# Altium PCB STEP_DRIVER_V3.0.PcbDoc (part 2 of 5)
Units mm, origin at the board's own origin, x right, y up, seen from the top; angles counter-clockwise.
Board outline 245.25 x 200.25 mm, 2 copper layers (Top Layer, Bottom Layer), stack 1.371 mm thick; 477 components, 170 nets, 1104 pads, 876 vias.
Unrouted connection lines stored in the file: 4.
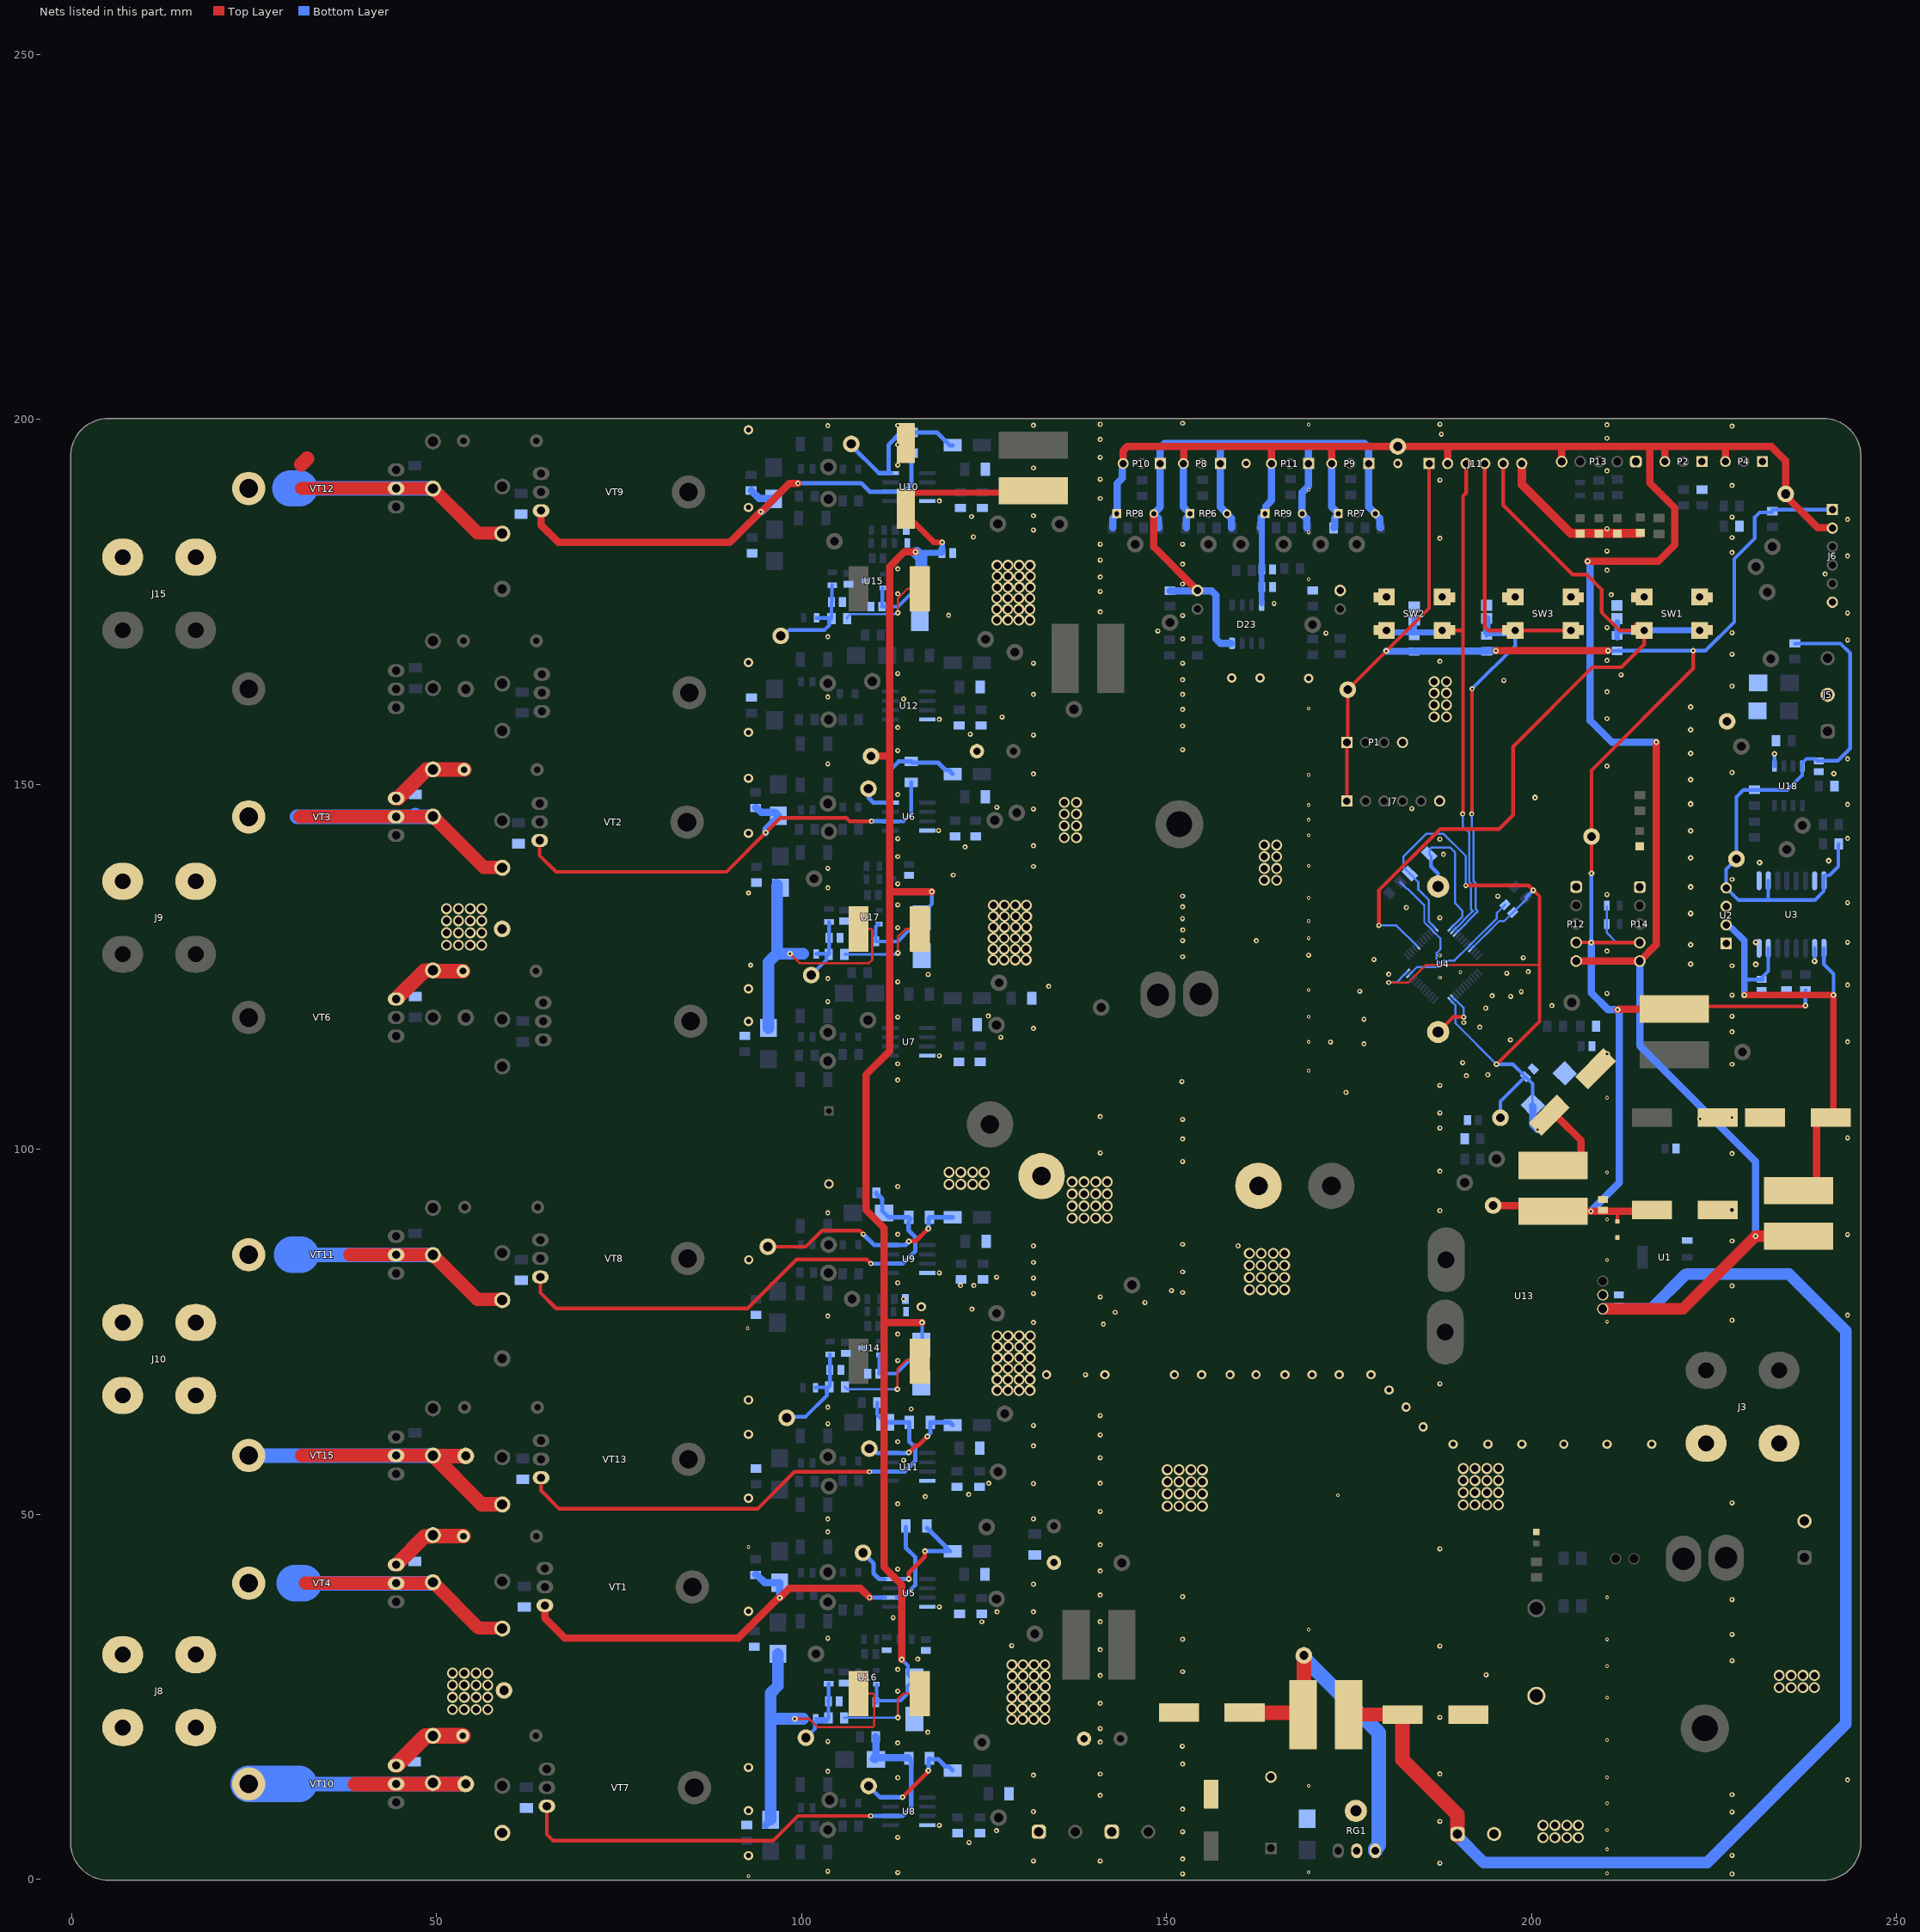
[diagram p2: the nets of this part, all layers, seen from the top]

## Part data
C1 C2 C45 C57 C58 C90 C91: library part 1000uF_10V_Size_F
C3: library part CMP-05427-000015-1, "CAP ALUM 100UF 20% 50V SMD", Capacitance=100uF, Leakage Current=100uA, Manufacturer=Panasonic, Package=SF, Ripple Current=200mA, Temperature="-40°C to +85°C", Temperature Range High=+85°C, Temperature Range Low=-40°C, Tolerance=20%, Voltage=50V, Automotive=Yes, Automotive Grade="Grade 3", Category=Cap, ComponentLink2Description=Datasheet, ComponentLink2URL=https://industrial.panasonic.com/cdbs/www-data/pdf/RDE0000/ABA0000C1145.pdf, Device Class L1="Passive Components", Device Class L2=Capacitors, Device Class L3="Aluminum Electrolytic Capacitors", Digikey Description="CAP ALUM 100UF 20% 50V SMD", Dissipation Factor=0.12%, Height=10.5mm, Lead Free=Yes, Life=2000Hours, Manufacturer Part Number=EEE-1HA101UP, Material=Aluminum, Mouser Description="Cap Aluminum Lytic 100uF 50V 20% (8 X 10.2mm) SMD 200mA 2000h 85C Automotive T/R", Octopart=https://octopart.com/eee-1ha101up-panasonic-55396734, RoHS=TRUE, Voltage Rating=50V
C4 C5 C88: library part CAP-POLAR
C6 C61 C62 C63 C64: "Capacitor Polarised", Manufacturer_Name=Vishay, Mouser Part Number=74-293D106X9050E2TE3, Arrow Part Number=293D106X9050E2TE3, Height=4.3mm, Manufacturer_Part_Number=293D106X9050E2TE3
  C6: Arrow Price/Stock=https://www.arrow.com/en/products/293d106x9050e2te3/vishay, Datasheet Link=http://www.vishay.com/doc?40002, Mouser Price/Stock=https://www.mouser.com/Search/Refine.aspx?Keyword=74-293D106X9050E2TE3
  C61 C62 C63 C64: Arrow Price/Stock=https://www.arrow.com/en/products/293d106x9050e2te3/vishay?region=nac, Datasheet Link=http://www.vishay.com/docs/40002/293d.pdf, Mouser Price/Stock=https://www.mouser.co.uk/ProductDetail/Vishay-Sprague/293D106X9050E2TE3?qs=N31o%252Bt096gu9lsvzLRhHsg%3D%3D
C7 C33 C48 C55 C56 C60 C70 C72 C73 C74 C77 C78 C79 C81 C83 C84 C86 C87: library part CAP-NON-POLAR
C8 C10 C17 C18 C19 C20 C21 C22 C23 C26 C27 C28 C40 C46 C49 C51 C53 C59 C65 C66 C67 C68 C85 C89 C92 C93 C94 C95 C96: library part CMP-1036-04552-2, "CAP CER 0.22UF 50V X7R 0805", Capacitance="0.22 μF", Manufacturer=KEMET, Package=C0805C-DN, Temperature="-55°C to +125°C", Temperature Characteristic=X7R, Temperature Coefficient=30ppm/°C, Temperature Range High=+125°C, Temperature Range Low=-55°C, Tolerance=0.1, Voltage Rating="50 V", Automotive=No, Category=Cap, ComponentLink2Description=Datasheet, ComponentLink2URL=https://content.kemet.com/datasheets/KEM_C1003_C0G_SMD.pdf, Device Class L1="Passive Components", Device Class L2=Capacitors, Device Class L3="Ceramic Capacitors", Digikey Description="CAP CER 0.22UF 50V X7R 0805", Height=0.88mm, Ipc Land Pattern Name=CAPC200125X78, Lead Free=Yes, Manufacturer Part Number=C0805C224K5RACTU, Material=Ceramic, Mouser Description="CAP CER 0.22UF 50V X7R 0805", Octopart=https://octopart.com/c0805c224k5ractu-kemet-144670, RoHS=TRUE
C42: library part CMP-00287-17080245-1, "ECQ-E2224JFW ECQE, Met Polyester Film Cap Radial Lead 250VDC, 0.22uF, 5%, L/S =10mm, Blk CRMP", Capacitance=220nF, Case/Package=Radial, Dielectric=PET, Dielectric Material=Polyester, Max Operating Temperature=105°C, Min Operating Temperature=-40°C, Tolerance=5%, Voltage Rating (DC)=250V, Height - Seated (Max)=15.494mm, Lead Pitch=10mm, Length=11.9888mm, Mount="Through Hole", NexarPartId=17080245, RoHS=Compliant, Termination=Radial, Width=5.5118mm
C43: library part CMP-1036-04552-2, "CAP CER  2.2UF 50V X7R 0805", Capacitance="0.22 μF", Manufacturer=KEMET, Manufacturer Part Number=C0805C224K5RACTU, Package=C0805C-DN, Temperature="-55°C to +125°C", Temperature Characteristic=X7R, Temperature Coefficient=30ppm/°C, Temperature Range High=+125°C, Temperature Range Low=-55°C, Tolerance=0.1, Voltage Rating="50 V", Automotive=No, Category=Cap, ComponentLink2Description=Datasheet, ComponentLink2URL=https://content.kemet.com/datasheets/KEM_C1003_C0G_SMD.pdf, Device Class L1="Passive Components", Device Class L2=Capacitors, Device Class L3="Ceramic Capacitors", Digikey Description="CAP CER 0.22UF 50V X7R 0805", Height=0.88mm, Ipc Land Pattern Name=CAPC200125X78, Lead Free=Yes, Material=Ceramic, Mouser Description="CAP CER 0.22UF 50V X7R 0805", Octopart=https://octopart.com/c0805c224k5ractu-kemet-144670, RoHS=TRUE
C44: library part CMP-1036-04552-2, "CAP CER 2.2UF 50V X7R 0805", Capacitance="0.22 μF", Manufacturer=KEMET, Manufacturer Part Number=C0805C224K5RACTU, Package=C0805C-DN, Temperature="-55°C to +125°C", Temperature Characteristic=X7R, Temperature Coefficient=30ppm/°C, Temperature Range High=+125°C, Temperature Range Low=-55°C, Tolerance=0.1, Voltage Rating="50 V", Automotive=No, Category=Cap, ComponentLink2Description=Datasheet, ComponentLink2URL=https://content.kemet.com/datasheets/KEM_C1003_C0G_SMD.pdf, Device Class L1="Passive Components", Device Class L2=Capacitors, Device Class L3="Ceramic Capacitors", Digikey Description="CAP CER 0.22UF 50V X7R 0805", Height=0.88mm, Ipc Land Pattern Name=CAPC200125X78, Lead Free=Yes, Material=Ceramic, Mouser Description="CAP CER 0.22UF 50V X7R 0805", Octopart=https://octopart.com/c0805c224k5ractu-kemet-144670, RoHS=TRUE
C47 C50 C52 C54: library part CMP-1036-04552-2, "CAP CER 0.22UF 50V X7R 0805", Capacitance="0.22 μF", Manufacturer=KEMET, Manufacturer Part Number=C0805C224K5RACTU, Package=C0805C-DN, Temperature="-55°C to +125°C", Temperature Characteristic=X7R, Temperature Coefficient=30ppm/°C, Temperature Range High=+125°C, Temperature Range Low=-55°C, Tolerance=0.1, Voltage Rating="50 V", Automotive=No, Category=Cap, ComponentLink2Description=Datasheet, ComponentLink2URL=https://content.kemet.com/datasheets/KEM_C1003_C0G_SMD.pdf, Device Class L1="Passive Components", Device Class L2=Capacitors, Device Class L3="Ceramic Capacitors", Digikey Description="CAP CER 0.22UF 50V X7R 0805", Height=0.88mm, Ipc Land Pattern Name=CAPC200125X78, Lead Free=Yes, Material=Ceramic, Mouser Description="CAP CER 0.22UF 50V X7R 0805", Octopart=https://octopart.com/c0805c224k5ractu-kemet-144670, RoHS=TRUE
D1 D2 D6 D10 D11 D12 D19 D20: library part CMP-12791-000009-1, "DIODE GEN PURP 400V 1A SMA", Capacitance=20pF, Forward Current=1A, Manufacturer="Diodes Inc.", Max Junction Temp=+150°C, Max Repetitive Reverse Voltage=400V, Max Surge Forward Current=30A, Package=SMA, Peak Reverse Current=5uA, Temperature="-65°C to +150°C", Temperature Range Low=-65°C, Automotive=No, Category=Diode, ComponentLink2Description=Datasheet, ComponentLink2URL=https://www.diodes.com/assets/Datasheets/ds16008.pdf, Device Class L1="Discrete Semiconductors", Device Class L2=Diodes, Device Class L3="Rectifier Diodes", Digikey Description="DIODE GEN PURP 400V 1A SMA", Footprint Url=https://www.diodes.com/assets/Package-Files/SMA.pdf, Height=2.4mm, Lead Free=Yes, Manufacturer Part Number=US1G-13-F, Mouser Description="Rectifiers 400V 1A", Octopart=https://octopart.com/us1g-13-f-diodes+inc.-334651, Reverse Voltage=400V, RoHS=TRUE, Standoff Height=0.05mm, Temperature Range High=+150°C
D3 D4 D5 D7 D8 D9 D13 D14 D15 D16 D17 D18 D21 D24 D25 D26 D27: library part CMP-249167-000001-1, "DIODE GEN PURP 75V 150MA SOD80", Capacitance=4pF, Forward Current=300mA, Manufacturer="Vishay Small Signal", Max Junction Temp=+175°C, Max Repetitive Reverse Voltage=100V, Max Surge Forward Current=2A, Package=6.560-5005.01-4, Peak Reverse Current=5uA, Reverse Voltage=75V, Temperature="to +175°C", Automotive=Yes, Automotive Grade="Grade 0", Category=Diode, ComponentLink2Description=Datasheet, ComponentLink2URL=http://www.vishay.com/docs/85557/ll4148.pdf, Device Class L1="Discrete Semiconductors", Device Class L2=Diodes, Device Class L3="Rectifier Diodes", Digikey Description="DIODE GEN PURP 75V 150MA SOD80", Height=1.6mm, Lead Free=Yes, Manufacturer Part Number=LL4448-GS08, Mouser Description="Diodes - General Purpose, Power, Switching 100 Volt 100mA", Octopart=https://octopart.com/ll4448-gs08-vishay+small+signal-40886, RoHS=TRUE, Temperature Range High=+175°C
D22 D28 D29 D30 D31: "WURTH ELEKTRONIK - 151031YS06000 - LED, Yellow, Through Hole, T-1 (3mm), 30 mA, 2 V, 590 nm", Manufacturer_Name="Wurth Elektronik", Mouser Part Number=710-151031YS06000, Datasheet Link=https://katalog.we-online.de/led/datasheet/151031YS06000.pdf, Geometry.Height=5.5mm, Manufacturer_Part_Number=151031YS06000, Mouser Price/Stock=https://www.mouser.co.uk/ProductDetail/Wurth-Elektronik/151031YS06000?qs=LlUlMxKIyB3xSYYW%252BcuBiQ%3D%3D
D23: "Микросхема сдвоенный ОУ", Package=8-SOIC, ComponentDescription="Микросхема сдвоенный ОУ, LMV358AIDR, 8-SOIC", ComponentTypе="Микросхема сдвоенный ОУ"
D32: library part CMP-02541-000001-1, "DIODE ZENER 15V 1.3W DO41", Manufacturer=Vishay, Max Junction Temp=+175°C, Max Reverse Leakage Current=0.5uA, Max Zener Voltage=15.6V, Nom Zener Voltage=15V, Package=6.561-5001.02-4, Power Dissipation=1300mW, Reverse Voltage=11V, Temperature="to +175°C", Automotive=Yes, Automotive Grade="Grade 0", Category=Diode, ComponentLink2Description=Datasheet, ComponentLink2URL=http://www.vishay.com/docs/85607/bzx85.pdf, Device Class L1="Discrete Semiconductors", Device Class L2=Diodes, Device Class L3="Zener Diodes", Digikey Description="DIODE ZENER 15V 1.3W DO41", Height=2.6mm, Lead Free=Yes, Manufacturer Part Number=BZX85C15-TAP, Mouser Description="Zener Diodes 15 Volt 1.3 Watt 5%", Octopart=https://octopart.com/bzx85c15-tap-vishay-55401762, RoHS=TRUE, Temperature Range High=+175°C, Zener Impedance=15Ω
D33: library part CMP-14400-000025-1, "DIODE ZENER 5.1V 300MW SOD323"
J1 J2 J4 J13: "WR-TBL Series 101 Horizontal Entry Modular, THT, pitch 5mm, 2p", Manufacturer="Wurth Elektronik", Operating Temperature Max=105°C, Operating Temperature Min=-40°C, Rated Current=16A, Working Voltage=250V, Application="Pressure Clamp", Category="Terminal Blocks", ComponentLink1Description="Website Link", ComponentLink1URL=https://www.we-online.com/redexpert/article/691101710002?ad, ComponentLink2Description="Datasheet Link", ComponentLink2URL=https://www.we-online.com/redexpert/spec/691101710002?ad, Manufacturer Part Number=691101710002, Match Code=WR-TBL, Modularity=Yes, Mount="Through Hole", Number of Pins=2, Number of Rows=1, Orientation=Horizontal, Packaging=Box, Pitch=5mm
J3 J8 J9 J10 J15: library part Connector_Tianli_T-800
J5: "WR-TBL Series 101 Horizontal Entry Modular, Through Hole, pitch 5mm, 3p", Manufacturer="Wurth Elektronik", Operating Temperature Max=105°C, Operating Temperature Min=-40°C, Rated Current=16A, Working Voltage=250V, Application="Pressure Clamp", Category="Terminal Blocks", ComponentLink1Description="Manufacturer Link", ComponentLink1URL=https://www.we-online.com/redexpert/article/691101710003?ad, ComponentLink2Description=Datasheet, ComponentLink2URL=https://www.we-online.com/redexpert/spec/691101710003?ad, Manufacturer Part Number=691101710003, Match Code=WR-TBL, Modularity=Yes, Mount="Through Hole", Orientation=Horizontal, Packaging=Box, PCB/Cable/Panel=PCB, Pin Number=3, Pitch=5mm
L1 L4 L5 L6 L7 L8 L9: library part CMP-0227-00501-2, Ambient Temperature Range High=85°C, Ambient Temperature Range Low=-40°C, Current Rating=620mA, DC Resistance (DCR)=500mΩ, Inductance=270µH, Max Operating Temperature=125°C, Self Resonant Frequency=4MHz, Height=5.4mm, Length=9mm, Min Operating Temperature=-40°C, NexarPartId=24533346, Packaging=Digi-Reel®, RoHS=Compliant, Width=10mm
LED3 LED4: "THT LED round mono-color waterclear, WL-TMRW , Blue", Emitting color=Blue, Manufacturer="Wuerth Elektronik", ComponentLink1Description="Manufacturer URL", ComponentLink1URL=http://www.we-online.com, ComponentLink2Description=Datasheet, ComponentLink2URL=http://katalog.we-online.de/pbs/datasheet/7448042001.pdfhttp://katalog.we-online.de/pbs/datasheet/7448042001.pdfhttp://katalog.we-online.de/pbs/datasheet/7448042001.pdfhttp://katalog.we-online.de/pbs/datasheet/151033BS03000.pdf, PackageReference="Type 3mm", PartNumber=151033BS03000
P1: library part CMP-1024-00357-1, "0.025\" SQ Post Header, Through-hole, Vertical, -55 to 125 degC, 2.54 mm Pitch, 4-Pin, Male, RoHS", Manufacturer=Samtec, Temperature Range="-55 to 125 degC", ComponentLink1Description="Manufacturer URL", ComponentLink1URL=http://www.samtec.com, ComponentLink2Description=Datasheet, ComponentLink2URL=http://www.samtec.com/documents/webfiles/pdf/TSW_TH.PDF, ComponentLink3Description="Package Specification", ComponentLink3URL=http://www.samtec.com/documents/webfiles/cpdf/TSW-XXX-XX-XXX-X-XX-XXX-MKT.pdf, DatasheetVersion=F-214, Mounting Technology=Through-hole, Orientation=Vertical, PackageDescription=".025[0.64] SQ. Post Terminal Strip Assembly", PackageReference=TSW-104-08-X-S, PackageVersion="DM, 8/1988", PartNumber=TSW-104-08-G-S, Pitch="2.54 mm", RoHS=True
P2 P4 P8 P9 P10 P11: "WR-WTB THT Male Vertical Locking Header, pitch 2.54mm, 3p", Contact Resistance=20mOhm, Operating Temperature="-40 to +105degC", Rated Current=3A, Withstanding Voltage=1000VAC, Working Voltage=250VAC, ComponentLink1Description=Manufacturer, ComponentLink1URL=http://www.we-online.de, ComponentLink2Description=Datasheet, ComponentLink2URL=https://www.we-online.com/catalog/datasheet/61900311121.pdf, Gender=Male, Mounting Technology=THT, Packaging=Bag, Part Number=61900311121, Pin Number=3, Pitch=2.54mm, Published Date="January 2020", Publisher="Wurth Elektronik", Type=Vertical
P12 P13 P14: "WR-PHD Pin Header, THT, Vertical, pitch 2.54mm, 1 Row, 5P", Contact Resistance=20mΩ, Manufacturer="Wurth Elektronik", Operating Temperature Max=105°C, Operating Temperature Min=-40°C, Rated Current=3A, Withstanding Voltage=500V, Working Voltage=250V, Category="Board-to-Board Connectors", ComponentLink1Description="Website Link", ComponentLink1URL=https://www.we-online.com/redexpert/article/61300511121?ad, ComponentLink2Description="Datasheet Link", ComponentLink2URL=https://www.we-online.com/redexpert/spec/61300511121?ad, Gender="Pin Header", Manufacturer Part Number=61300511121, Match Code=WR-PHD, Mount="Through Hole", Number of Pins=5, Number of Rows=1, Orientation=Vertical, Packaging=Bag, Pitch=2.54mm
R1: library part RES-CONST
R6 R7 R11 R14 R19 R21 R31 R34 R41 R42 R43 R44 R65 R68 R75 R78: library part CMP-03412-028725-1, "RES SMD 10 OHM 1% 1/8W 0805", Manufacturer=Yageo, Package=RT0805, Power Rating=0.125W, Resistance=10Ω, Temperature="-55°C to +155°C", Temperature Coefficient="50 ppm/°C", Temperature Range High=+155°C, Temperature Range Low=-55°C, Tolerance=0.0001, Voltage Rating=150V, Automotive=No, Category=Res, ComponentLink2Description=Datasheet, ComponentLink2URL=http://www.yageo.com/documents/recent/PYu-RT_1-to-0.01_RoHS_L_9.pdf, Composition="Thin Film", Device Class L1="Passive Components", Device Class L2=Resistors, Device Class L3="Chip SMD Resistors", Digikey Description="RES SMD 10 OHM 1% 1/8W 0805", Footprint Url=http://www.yageo.com/exep/pages/download/literatures/PYu-R_Mount_10.pdf, Height=0.6mm, Ipc Land Pattern Name=RESC200125X50, Lead Free=Yes, Manufacturer Part Number=RT0805FRE0710RL, Mouser Description="High Precision-High Stability Chip Resistor Thin Film 0805 10Ohm 1% Paper T/R", Octopart=https://octopart.com/rt0805fre0710rl-yageo-39855890, RoHS=TRUE, Series=RT
R8 R9 R30 R33 R35 R36 R57 R58 R61 R62 R69 R70 R71 R72 R73 R74 R76 R77 R108 R110 R112 R113 R114 R115 R119 R120 R122 R123 R124 R125 R143 R144 R145 R146 R147 R148: library part RC0805FR-07100KL
R28 R59: library part CRCW08050000Z0EA
R111: library part RC0805FR-07100KL, "2.2K"
R121: library part RC0805FR-07100KL, "220"
RG1: "REG IC REG LINEAR 5V 1A TO220AB", Current-Output=1A, Digikey Part Number=LM7805CT-ND, Manufacturer=Fairchild, Mouser Part Number=512-LM7805CT, Package=TO220, Part Number=LM7805CT, Temperature="-40°C to +125°C", Temperature Range High=+125°C, Temperature Range Low=-40°C, Voltage - Input (Max)=35V, Voltage - Output=5V, Voltage Dropout (Max)="2V @ 1A (Typ)", ComponentLink1Description=Upverter, ComponentLink1URL=https://upverter.com/upn/revision/b27a7358b7dd93a3/, ComponentLink2Description=Datasheet, ComponentLink2URL=https://www.fairchildsemi.com/datasheets/LM/LM7805.pdf, Digikey Description="REG IC REG LINEAR 5V 1A TO220AB", helpURL=https://upverter.com/upn/revision/b27a7358b7dd93a3/, Ipc Land Pattern Name=TO-220, Lead Free=yes, Price=0.384521982769, RoHS=TRUE, Supplier 1=Digi-Key, Supplier 2=Mouser, Supplier Part Number 1=LM7805CT-ND, Supplier Part Number 2=512-LM7805CT
RP6 RP7 RP8 RP9: library part 3296W-1-202LF
SW1 SW2 SW3: "No Description Available", Mfr_Name="TE Connectivity", Copyright="Copyright (C) 2022 Ultra Librarian. All rights reserved.", Manufacturer_Part_Number=4-1437565-2, RefDes=RefDes, Type=DEV
TP1 TP2 TP3 TP4 TP5 TP6 TP7 TP8 TP9 TP10 TP11 TP12 TP13 TP14 TP15 TP16 TP17 TP18 TP19 TP20 TP21 TP22 TP23 TP24 TP25 TP26 TP27 TP28 TP29 TP30 TP31 TP32 TP33 TP34 TP35 TP36 TP37 TP38 TP39 TP40 TP42 TP43 TP44 TP45 TP46 TP47 TP48 TP49 TP50 TP51 TP52 TP53 TP54 TP55 TP56 TP57 TP58 TP59 TP60 TP61 TP62 TP63 TP64 TP65 TP66 TP67 TP68 TP69 TP70 TP71 TP72 TP73 TP74 TP75 TP76 TP77 TP78 TP79 TP80 TP81 TP82 TP83 TP84 TP85 TP86 TP87 TP88 TP89 TP90: library part TP_PCB?, "Test_Point"
U1: library part CMP-0062-01639-4, "800mA Low-Dropout Linear Regulator, 4-pin SOT-223, Pb-Free", Manufacturer="Texas Instruments", PackageTopMarking=XYTT*N05A, PowerWise=N, Code_IPC=SOT223-4, Code_JEDEC=TO-261-AA, ComponentLink1Description="Datasheet URL", ComponentLink1URL=http://www.ti.com/general/docs/lit/getliterature.tsp?genericPartNumber=LM1117-N&fileType=pdf, CompType="LDO IC", High-Reliability=Y, PackageDescription="Molded SOT-223, 6.50 x 3.56 x 1.6mm Body, 4 Lead, 2.3mm Pitch", PackageReference=DCY0004A, PartNumber=LM1117MPX-3.3/NOPB, PinCount=4, RoHS=Y
U2: library part B0505s-1W, "DC DC Converter 5V 1W"
U3: library part CMP-0534-00565-1, "Quad Channel Digital Isolator, 2.5 KV rms Insulation Rating, 10 Mbps Data Rate, 50 ns Delay, Industrial, 16-pin SOIC (RW-16), Tube", Manufacturer="Analog Devices", Max Operating Temp (degreesC)=125, Code_JEDEC=MS-013-AA, ComponentLink1Description="Manufacturer URL", ComponentLink1URL=http://www.analog.com/en/index.html, ComponentLink2Description=Datasheet, ComponentLink2URL=http://www.analog.com/static/imported-files/data_sheets/ADuM1400_1401_1402.pdf, ComponentLink3Description="Package Specification", ComponentLink3URL=http://www.analog.com/static/imported-files/packages/PKG_PDF/SOIC_WIDE%20%28RW%29/RW_16.pdf, ComponentLink4Description="URL Link1", ComponentLink4URL="Product URL:http://www.analog.com/en/interface-isolation/digital-isolators/adum1401/products/product.html", ComponentLink5Description="URL Link2", ComponentLink5URL="Reference Circuit:http://www.analog.com/en/interface-isolation/digital-isolators/adum1401/products/product.html#product-recommendations", DatasheetVersion="Rev. H", Max Data Rate=10Mbps, Mounting Technology="Surface Mount", PackageDescription="16-Pin Standard Small Outline Package, Body 10.3 x 7.5 mm, Pitch 1.27 mm", PackageReference=RW-16, PackageVersion="032707-B, 03/2007", PartNumber=ADUM1401BRWZ
U4: "No Description Available", Mfr_Name=STMicroelectronics, RefDes=RefDes, Type=Type
U5 U6 U7 U8 U9 U10 U11 U12: "No Description Available", Mfr_Name=Infineon, Copyright="Copyright (C) 2023 Ultra Librarian. All rights reserved.", Manufacturer_Part_Number=IR2104SPBF, RefDes=RefDes, Type=DEV
U14 U15 U16 U17: library part MCP6001T
VD17: library part ZENER
VT1 VT2 VT3 VT4 VT5 VT6 VT7 VT8 VT9 VT10 VT11 VT12 VT13 VT14 VT15 VT16: "Транзистор МОП, одиночный, N-канальный", Package=TO-220(bend2), ChannelType=N-канальный, ComponentDescription="Транзистор МОП, одиночный, N-канальный, IRF3205, TO-220(bend2)", ComponentType="Транзистор МОП, одиночный"

## Via types
v1: diameter 0.7/0.7 (per signal layer), hole 0.3, Top Layer to Bottom Layer, tented both sides, 388 vias
v2: diameter 1.5/0.7 (per signal layer), hole 1, Top Layer to Bottom Layer, tented both sides, 206 vias
v3: diameter 0.8, hole 0.3, Top Layer to Bottom Layer, tented both sides, 99 vias
v4: diameter 1.5, hole 1, Top Layer to Bottom Layer, 96 vias
v5: diameter 0.5, hole 0.254, Top Layer to Bottom Layer, tented both sides, 42 vias
v6: diameter 1.27, hole 0.711, Top Layer to Bottom Layer, tented both sides, 22 vias
v7: diameter 1.27, hole 0.711, Top Layer to Bottom Layer, 17 vias
v8: diameter 1.27, hole 0.711, Top Layer to Bottom Layer, tented top, 2 vias
v9: diameter 1, hole 0.5, Top Layer to Bottom Layer, 2 vias
v10: diameter 0.7, hole 0.254, Top Layer to Bottom Layer, tented both sides, 2 vias

## Nets (pads, with @x,y where several pads share a name; then routed paths per layer and width w, separated by ;. In a path a pad name is that pad's centre, name@x,y a point inside that pad or via, vN(x,y) a via of type N, cw(c..) or ccw(c..) an arc to the next point about the centre after c; other vN are vias at no path point)
+3V3: C58.1 C59.1 D33.1 J6.1 J7.1 J11.1 L4.2 L5.2 P1.1 P12.4 P14.4 R4.2 R5.2 R58.1 R61.1 R116.2 R117.2 R118.2 TP2.1 TP73.1 TP86.1 | length 279.1
  Top Layer w0.5: J7.1@174.713,147.725 P1.1@174.713,155.748 174.825,155.86 TP73.1@174.825,162.975 v3(180.132,168.282) 185.974,174.124 J11.1@185.974,193.963 ; P12.4@206.1,128.38 206.13,128.35 208.165,128.35 v3(208.175,128.34) P14.4@214.834,128.34 ; v3(208.225,137.8) TP2.1@208.225,142.862 208.225,151.925 222.15,165.85 v3(222.15,168.325) ; D33.1@211.775,90.125 211.775,91.525 ; L5.2@219.475,119.575 237.315,119.575 237.44,119.7 v3(237.521,119.7)
  Top Layer w1: TP86.1@194.75,92.3 202.168,92.3 L4.2@202.943,91.525 ; v3(195.119,168.3) v3@210.486,168.3 ; L4.2@204.5,91.525 v3(208.137,91.525) 211.775,91.525 C58.1@213.95,91.525 ; v3(211.814,119.136) 211.889,119.211 L5.2@219.564,119.211
  Bottom Layer w0.3: R58.1@210.316,130.766 R61.1@210.316,133.264 ; 210.324,131.838 R58.1@210.324,130.859 210.324,129.671 211.676,128.319 P14.4@214.834,128.319
  Bottom Layer w0.5: v3(208.175,128.34) 208.2,128.365 208.2,137.775 v3(208.225,137.8) ; v3(210.487,168.299) 211.741,168.299 211.754,168.312 222.137,168.312 v3(222.15,168.325) 223.849,168.325 227.782,172.257 227.782,180.902 230.593,183.713 230.593,186.614 231.25,187.271 232.87,187.271 R4.2@233,187.401 ; R4.2@233,187.65 J6.1@241.225,187.65 ; v3(237.521,119.7) 237.521,121.79 R5.2@237.53,121.799
  Bottom Layer w1: v3(180.132,168.282) 180.181,168.233 183.945,168.233 183.953,168.241 193.856,168.241 193.864,168.249 193.915,168.3 v3(195.119,168.3) ; v3(208.137,91.525) 212.009,95.397 212.009,118.941 v3(211.814,119.136) 210.502,119.136 208.175,121.463 v3(208.175,128.34)
+3V3_All: C61.1 C62.1 C63.1 C64.1 C65.1 C66.1 C67.1 C68.1 C89.1 C90.1 L9.2 TP90.1 U14.5 U15.5 U16.5 U17.5 | length 258.8
  Top Layer w0.8: C90.1@114.299,187.762 114.299,189.128 115.121,189.95 131.476,189.95 L9.2@131.754,190.228 L9.2@133.397,190.228 ; C90.1@114.682,187.762 114.682,186.609 118.115,183.175 v3(119.275,183.175)
  Top Layer w1: TP90.1@109.525,153.875 111.668,153.875 ; v3(113.72,30.106) 113.722,30.108 113.722,40.346 111.286,42.782 111.286,76.325 ; v3(115.634,181.843) 114.068,181.843 112.075,179.85 112.075,135.275 ; v3(116.514,76.285) 111.326,76.285 111.286,76.325 ; v3@117.857,135.275 112.075,135.275 ; 111.286,76.325 111.286,89.246 108.818,91.714 108.818,110.202 112.075,113.459 112.075,135.275
  Bottom Layer w0.5: C66.1@110.28,24.15 U16.5@110.28,26.7 ; C66.1@110.305,24.275 110.484,24.454 113.554,24.454 114.475,25.375 114.475,26.402 C61.1@115.336,27.264 ; U17.5@110.627,130.873 110.502,130.873 110.427,130.798 110.427,130.755 110.177,130.505 C67.1@110.177,128.479 113.195,128.479 115,130.284 115.475,130.284 116.45,131.259 C63.1@116.45,131.734 ; U14.5@110.672,71.85 110.622,71.8 110.622,69.325 C65.1@110.572,69.275 112.975,69.275 115.425,71.725 116.4,72.7 C62.1@116.4,73.175 116.514,73.289 v3(116.514,76.285) ; U15.5@111.118,176.923 111.068,176.873 111.068,174.41 C68.1@111.018,174.36 113.235,174.36 115.225,176.35 115.225,177.5 C64.1@115.625,177.9 ; v3(113.72,30.106) 113.722,30.106 114.571,29.257 114.571,28.029 C61.1@115.336,27.264 ; C61.1@115.45,27.15 C61.1@115.336,27.264 ; C61.1@115.45,27.377 C61.1@115.336,27.264 ; C63.1@116.45,131.805 116.45,132.209 117.857,133.616 v3(117.857,135.305)
  Bottom Layer w0.8: v3(115.634,181.843) 115.759,181.718 C89.1@119.215,181.718 119.275,181.777 v3(119.275,183.175)
  Bottom Layer w1.6: v3@115.759,181.718 116.403,181.073 116.403,178.114 C64.1@116.2,177.91
+5V: C26.1 C27.1 C40.1 C45.1 D23.8 J4.1 J6.2 J11.2 L1.2 L6.1 P2.3 P4.3 P8.3 P9.3 P10.3 P11.3 P12.5 P13.5 P14.5 R88.2 RP6.1 RP7.1 RP8.1 RP9.1 TP13.1 TP14.1 U1.3 U13.1 | length 529.1
  Top Layer w1: P10.3@144.064,193.963 144.064,195.714 144.65,196.3 152.195,196.3 ; P8.3@152.319,193.963 152.393,194.037 152.393,196.102 152.195,196.3 ; P11.3@164.384,193.963 164.384,196.277 164.361,196.3 ; P9.3@172.639,193.963 172.639,196.3 ; L1.2@174.964,22.55 174.983,22.57 L1.2@175.341,22.57 ; C45.1@181.605,22.57 182.322,22.57 183.147,22.57 183.167,22.55 C45.1@183.85,22.55 ; J11.2@188.514,193.963 188.514,196.3 ; P13.5@204.135,194.217 204.135,196.3 ; P12.5@206.1,125.82 P12.5@206.12,125.8 214.814,125.8 P14.5@214.834,125.779 217.1,128.045 v3(217.1,155.8) ; v3(207.7,180.55) 217.37,180.55 219.652,182.832 219.652,187.854 216.229,191.277 216.229,196.3 ; P2.3@218.28,194.225 218.28,196.3 ; P4.3@226.57,194.225 226.57,196.3 ; TP13.1@234.827,189.45 TP13.1@234.827,189.798 234.827,194.336 232.862,196.3 226.57,196.3 ; TP13.1@234.87,189.493 239.183,185.18 J6.2@241.25,185.18 ; 152.195,196.3 164.361,196.3 ; 164.361,196.3 172.639,196.3 ; 172.639,196.3 TP14.1@181.684,196.3 188.514,196.3 ; 188.514,196.3 201.464,196.3 204.135,196.3 ; 204.135,196.3 216.229,196.3 ; 216.229,196.3 218.28,196.3 ; 218.28,196.3 226.57,196.3
  Top Layer w1.6: U13.1@209.779,78.143 220.743,78.143 v3(230.7,88.1) L6.1@236.575,88.1
  Top Layer w1.9: L1.2@175.341,22.57 C45.1@181.605,22.57
  Top Layer w2: C45.1@182.322,22.57 182.322,16.378 189.85,8.85 J4.1@189.85,6.047
  Bottom Layer w0.8: D23.8@163.031,174.795 C27.1@163.031,179.434 ; C27.1@163.05,179.434 163.05,185.253
  Bottom Layer w1: 142.659,185.149 142.659,186.488 143.226,187.054 143.226,191.213 143.968,191.956 143.968,193.867 P10.3@144.064,193.963 ; P8.3@152.319,193.963 152.319,187.994 153.108,187.205 RP6.1@153.208,187.105 153.259,187.054 152.692,186.488 152.692,185.149 ; 162.979,185.046 162.876,185.149 162.979,185.253 162.979,186.589 RP9.1@163.495,187.105 163.595,187.205 163.595,188.102 164.384,188.891 P11.3@164.384,193.963 ; P9.3@172.639,193.963 172.639,187.994 RP7.1@173.528,187.105 173.579,187.054 173.012,186.488 173.012,185.253 R88.2@172.909,185.149 ; v3(207.7,180.55) 208.05,180.2 208.05,158.748 210.998,155.8 v3(217.1,155.8) ; P14.5@214.834,125.779 214.834,114.191 230.7,98.325 v3(230.7,88.1)
  Bottom Layer w1.6: J4.1@189.85,6.2 189.85,5.907 193.457,2.3 224.075,2.3 243.05,21.275 243.05,75.15 235.275,82.925 U1.3@221.35,82.925 ; U13.1@209.779,78.143 211.432,78.143 216.393,78.143 U1.3@221.125,82.875
+5V_ISO: C28.1 R3.2 R8.2 R9.2 TP1.1 U2.4 U3.10 U3.16 U18.8 | length 79
  Bottom Layer w0.5: TP1.1@228.229,139.078 TP1.1@228.479,139.328 ; U3.10@232.45,136.8 232.45,134.15 ; R3.2@236.092,169.301 242.326,169.301 243.65,167.977 243.65,154.925 241.962,153.237 C28.1@239.35,153.237 239.15,153.237 238.887,153.5 237.68,153.5 237.105,152.924 237.105,151.254 235.102,149.251 R9.2@230.55,149.251 230.548,149.249 229.046,149.249 228.079,148.282 TP1.1@228.079,139.778 226.675,138.373 U2.4@226.675,135.835 228.36,134.15 232.45,134.15 ; R8.2@242.098,141.851 242.025,141.777 242.025,138.755 240.823,137.553 240.162,137.553 240.07,137.46 U3.16@240.07,136.8 240.032,136.762 240.032,135.357 238.825,134.15 232.45,134.15
+5V_RS: C1.1 C85.1 L6.2 U2.2 U3.1 U3.7 | length 67
  Top Layer w0.5: v3@229.12,121.182 v3@229.169,121.133 ; L6.2@236.575,94.35 237.425,94.35 L6.2@239.05,95.975 ; C1.1@239.05,103.35 240.05,104.35 C1.1@240.6,104.35 ; C1.1@241,104.35 C1.1@240.6,104.35 ; C1.1@241.175,104.441 C1.1@241.266,104.35 ; v3@241.367,121.133 v3(241.375,121.142) ; C1.1@241.375,105.125 C1.1@240.6,104.35
  Top Layer w0.9: v3@229.169,121.133 v3@241.367,121.133 ; C1.1@241.375,105.125 v3(241.375,121.142)
  Top Layer w1: L6.2@239.05,95.975 C1.1@239.05,103.35
  Bottom Layer w0.5: U2.2@226.675,130.755 226.959,130.755 227.382,130.332 227.409,130.332 ; 229.149,123.275 C85.1@231.505,123.275 C85.1@231.705,123.275 ; C85.1@231.627,123.6 232.425,124.398 232.425,127.525 U3.7@232.45,127.55 ; U3.1@240.07,127.55 240.07,125.34 241.375,124.035 v3(241.375,121.142)
  Bottom Layer w0.9: 227.409,130.332 229.149,128.592 229.149,123.275 v3(229.149,121.125)
GND: BT1.1 C1.2 C2.2 C3.1 C4.2 C5.2 C6.2 C8.2 C9.1 C10.2 C11.1 C15.1 C16.1 C17.1 C18.1 C19.1 C20.2 C21.2 C22.2 C23.2 C25.1 C26.2 C27.2 C30.1 C34.1 C36.1 C38.2 C39.2 C40.2 C42.2 C43.1 C44.1 C45.2 C46.2 C49.2 C51.2 C53.2 C57.2 C58.2 C59.2 C61.2 C62.2 C63.2 C64.2 C65.2 C66.2 C67.2 C68.2 C85.2 C86.1 C87.1 C88.2 C89.2 C90.2 C91.2 C92.2 C93.2 C94.2 C95.2 C96.2 D22.2 D23.4 D28.2 D29.2 D30.2 D31.2 D32.2 D33.2 J1.1 J2.2 J3.1 J4.2 J6.6 J7.6 J11.6 J13.1 LED3.1 LED4.1 P1.4 P2.1 P4.1 P8.1 P9.1 P10.1 P11.1 P12.1 P13.1 P14.1 R12.1 R13.1 R17.1 R18.1 R22.2 R23.1 R24.1 R29.1 R32.1 R35.1 R36.1 R37.1 R39.2 R40.1 R46.1 R47.1 R49.1 R50.1 R55.1 R56.1 R62.2 R63.1 R64.1 R79.1 R80.1 R81.1 R82.1 R95.1 R96.1 R111.1 R112.1 R120.2 R126.1 R128.1 R130.1 R132.1 R134.1 R137.1 R138.1 R141.1 R142.1 R143.2 R144.2 RG1.2 RP6.3 RP7.3 RP8.3 RP9.3 SW1.1 SW1.2 SW2.1 SW2.2 SW3.1 SW3.2 U1.1 U2.1 U3.2 U3.8 U4.8 U4.23 U4.35 U4.47 U5.4 U6.4 U7.4 U8.4 U9.4 U10.4 U11.4 U12.4 U13.2 U14.2 U15.2 U16.2 U17.2 VD17.2 VD18.1 ZD4.1 | length 223.4
  Top Layer w0.3: v3(113.125,67.121) 113.125,69.85 114.425,71.15 116.025,71.15 R64.1@116.2,70.975 116.2,69.772 R64.1@114.975,68.547 ; v3(113.189,22.15) 113.189,24.671 113.968,25.45 R29.1@116.2,25.45 ; v3(113.189,126.89) 113.189,129.104 114.276,130.19 R32.1@116.2,130.19 ; v3(113.189,173.512) 113.189,175.447 114.551,176.809 116.196,176.809 R63.1@116.2,176.812
  Top Layer w0.5: BT1.1@187.218,116.076 189.267,118.125 v1(190.716,118.125)
  Top Layer w1: RP8.3@148.255,187.105 148.255,182.533 LED3.1@154.224,176.564
  Top Layer w1.2: J11.6@198.674,193.868 198.674,191.121 205.391,184.404 206.675,184.404 D22.2@214.92,184.404
  Bottom Layer w0.28: 182.011,136.617 182.973,135.655 183.092,135.655 185.325,133.422 185.325,131.104 185.947,130.482 U4.47@186.474,129.955 187.507,128.922 187.507,127.391 187.016,126.9 187.016,125.977 187.57,125.423 ; U4.35@183.292,123.945 184.325,124.978 187.126,124.978 187.57,125.423 ; U4.8@191.434,127.842 U4.8@191.807,128.214 ; C10.2@196.374,133.51 195.254,132.389 195.254,131.665 191.95,128.36 U4.8@191.423,127.834 189.456,125.867 188.015,125.867 187.57,125.423
  Bottom Layer w0.3: R35.1@105.844,22.1 105.894,22.15 v3(113.189,22.15) ; R36.1@105.867,126.71 112.874,126.71 113.054,126.89 v3(113.189,126.89) ; R111.1@105.952,67.45 106.281,67.121 v3(113.125,67.121) ; R112.1@106.246,172.725 106.246,172.901 106.674,173.329 112.871,173.329 113.054,173.512 v3(113.189,173.512) ; U4.23@189.302,120.763 190.716,119.349 v1(190.716,118.125)
  Bottom Layer w0.5: v3(238.784,125.775) 238.792,125.783 238.792,127.542 U3.2@238.8,127.55
  Bottom Layer w1: RP8.3@148.255,187.105 149.144,187.994 P10.1@149.144,193.963 149.144,196.121 149.73,196.706 157.399,196.706 ; RP8.3@148.306,187.109 148.306,187 148.872,186.434 148.872,185.253 148.975,185.149 ; R95.1@150.482,176.531 156.18,176.531 156.765,175.945 156.765,169.927 157.351,169.341 D23.4@158.881,169.341 ; RP6.3@158.288,187.051 RP6.3@158.326,187.013 ; RP6.3@158.288,187.105 157.399,187.994 P8.1@157.399,193.963 157.399,196.706 ; RP6.3@158.339,187 158.905,186.434 158.905,185.149 ; 169.192,185.149 169.192,186.434 168.626,187 168.626,187.054 RP9.3@168.575,187.105 168.575,189.992 169.464,190.881 P11.1@169.464,193.963 169.464,196.706 ; RP7.3@178.608,187.051 RP7.3@178.646,187.013 ; RP7.3@178.608,187.105 177.719,187.994 P9.1@177.719,193.963 177.719,196.121 177.133,196.706 169.464,196.706 ; RP7.3@178.659,187 179.225,186.434 179.225,185.253 179.328,185.149 ; 157.399,196.706 169.464,196.706
  other v1: 152.195,0.735 227.472,0.724 113.189,0.907 103.593,1.093 187.455,2.2 131.754,2.5 140.915,2.5 152.195,2.779 227.472,3.274 122.943,5.05 113.189,5.75 152.195,6.5 126.696,6.65 118.875,7.404 187.455,7.931 227.472,9.225 131.754,9.263 152.195,9.6 140.915,11.5 227.472,11.593 243.302,13.601 113.189,13.918 131.754,14.258 140.915,14.42 187.455,14.427 103.593,14.782 152.195,15.779 152.169,18.231 113.189,18.671 140.915,18.794 103.593,18.885 117.3,20.154 140.915,20.646 187.455,22.184 140.915,24.096 113.189,25.774 140.915,27.919 193.789,28.006 152.195,28.438 113.189,28.75 227.472,29.955 115.925,30.156 140.915,31.452 187.455,31.956 128.8,32.025 152.195,32.885 103.593,33.025 227.472,33.542 124.693,35.268 140.915,35.276 112.549,35.84 126.793,36.65 131.754,36.65 118.875,37.326 227.472,38.326 152.195,38.714 140.915,38.934 131.754,40.424 140.915,42.234 113.189,42.508 187.455,45.262 140.915,45.834 103.593,47.6 103.593,49.35 131.754,49.375 140.915,50.381 113.189,51.417 227.472,51.575 116.95,52.425 122.893,52.725 131.754,54.202 125.647,54.261 140.915,54.245 113.966,57.389 140.915,57.765 131.754,59.384 113.189,59.949 140.915,60.868 131.754,62.169 103.593,62.4 140.915,63.53 115.025,64.425 103.593,64.675 187.455,67.891 138.891,69.125 113.189,71.067 113.189,74.697 141.35,76.05 131.754,76.282 227.472,76.584 103.593,77.168 243.302,77.284 142.968,77.675 123.343,78.1 147.06,79.02 113.966,79.5 140.915,79.791 131.754,80.241 152.195,80.389 150.67,80.67 227.472,81.299 121.775,81.35 123.596,81.35 113.189,81.71 131.754,82.368 126.718,82.48 118.875,83.071 152.195,83.215 131.754,84.508 131.754,86.775 159.8,86.775 152.195,86.98 227.472,87.451 243.302,88.315 113.189,88.349 103.593,91.3 187.455,91.603 113.189,94.904 187.455,97.02 152.195,98.335 227.472,99.432 140.915,99.519 152.195,101.439 243.302,101.585 187.455,102.925 152.195,104.109 140.915,104.479 187.455,105 174.579,107.8 187.455,108.75 152.104,109.3 113.189,109.5 191.093,110.075 194.02,110.22 227.472,111.662 113.189,111.719 190.568,111.875 118.875,112.824 177.046,114.452 172.469,114.713 243.302,114.747 197.118,115 127.293,115.364 227.472,116.086 131.754,116.575 192.918,116.75 190.716,117.375 177.046,117.825 113.189,118.12 125.575,118.265 227.472,118.247 193.718,119.349 202.793,119.675 103.593,120.235 197.143,120.95 194.61,121.042 227.472,121.133 210.348,121.368 198.6,121.6 176.469,121.658 133.85,122.325 243.302,122.502 113.189,122.945 103.593,123.396 117.35,123.95 180.443,123.984 196.608,124.121 199.563,124.341 227.472,125.15 178.418,126.025 198.88,126.26 152.195,126.383 169.464,126.606 210.348,127.167 243.302,128.375 152.195,128.601 162.31,128.59 152.24,130.05 113.189,130.37 152.19,131.61 187.455,131.719 182.857,133.126 152.195,133.223 113.189,133.49 152.2,134.69 195.388,134.684 210.348,134.921 103.593,135.832 113.189,136.394 120.768,137.575 103.593,138.512 131.754,138.754 113.189,140.105 187.936,140.426 122.393,141.425 131.754,141.589 187.455,142.496 113.189,142.575 118.761,143.68 131.754,146.628 183.593,146.7 126.768,146.875 113.189,148.595 131.754,151.427 210.348,152.504 103.593,152.825 113.189,154.65 152.195,154.754 131.754,156.75 123.118,156.875 113.189,157.8 152.195,158.012 118.875,158.905 210.348,159.017 127.475,159.232 152.195,160.275 113.966,161.699 103.593,161.971 131.754,162.325 152.195,162.327 210.348,162.689 196.215,164.236 152.195,164.325 212.29,165 113.189,165.193 131.754,166.601 152.195,166.594 187.455,166.853 210.348,166.976 227.472,167.825 152.195,169.927 103.593,170.221 171.842,170.724 227.472,170.786 148.814,171.011 210.348,171.482 152.195,173.135 120.15,173.175 243.302,173.5 140.915,173.644 164.736,174.795 210.934,175.993 113.189,176.11 140.915,176.443 152.195,177.453 140.915,178.407 240.225,178.815 210.348,179.34 113.189,179.523 152.195,180.172 140.915,180.725 243.302,181.3 227.472,181.762 210.348,181.971 140.915,182.914 152.195,182.914 187.455,183.698 227.472,183.813 123.543,183.9 131.754,184.867 210.348,185.025 243.302,186.31 227.472,186.629 123.293,186.7 131.754,186.818 118.875,188.831 140.915,189.168 227.472,190.95 187.455,191.691 140.915,191.804 210.348,192.947 131.754,193.353 113.189,193.746 140.915,194.813 113.189,196.536 140.915,197.26 210.348,197.419 187.648,197.993 227.472,199.072 103.593,199.143 113.189,199.181 131.754,199.204 210.348,199.264 140.915,199.329 187.455,199.341 152.195,199.482
  other v2: 201.586,5.71 203.211,5.71 204.836,5.71 206.411,5.71 201.586,7.385 203.211,7.385 204.836,7.385 206.411,7.385 233.945,26.258 235.57,26.258 237.195,26.258 238.77,26.258 233.945,27.933 235.57,27.933 237.195,27.933 238.77,27.933 150.1,51.125 151.725,51.125 153.35,51.125 154.925,51.125 190.638,51.303 192.263,51.303 193.888,51.303 195.463,51.303 150.1,52.8 151.725,52.8 153.35,52.8 154.925,52.8 190.638,52.978 192.263,52.978 193.888,52.978 195.463,52.978 150.1,54.45 151.725,54.45 153.35,54.45 154.925,54.45 190.638,54.628 192.263,54.628 193.888,54.628 195.463,54.628 150.1,56.1 151.725,56.1 153.35,56.1 154.925,56.1 190.638,56.278 192.263,56.278 193.888,56.278 195.463,56.278 161.35,80.775 162.975,80.775 164.6,80.775 166.175,80.775 161.35,82.45 162.975,82.45 164.6,82.45 166.175,82.45 161.35,84.1 162.975,84.1 164.6,84.1 166.175,84.1 161.35,85.75 162.975,85.75 164.6,85.75 166.175,85.75 137.068,90.575 138.693,90.575 140.318,90.575 141.893,90.575 137.068,92.25 138.693,92.25 140.318,92.25 141.893,92.25 137.068,93.9 138.693,93.9 140.318,93.9 141.893,93.9 120.193,95.2 121.818,95.2 123.443,95.2 125.018,95.2 137.068,95.55 138.693,95.55 140.318,95.55 141.893,95.55 120.193,96.85 121.818,96.85 123.443,96.85 125.018,96.85 163.398,136.856 165.073,136.856 163.398,138.481 165.073,138.481 163.398,140.106 165.073,140.106 163.398,141.681 165.073,141.681 135.992,142.698 137.667,142.698 135.992,144.323 137.667,144.323 135.992,145.948 137.667,145.948 135.992,147.523 137.667,147.523 186.665,159.259 188.34,159.259 186.665,160.884 188.34,160.884 186.665,162.509 188.34,162.509 186.665,164.084 188.34,164.084
  other v3: 223.1,104.2 227.472,104.35 210.348,113.076 230.73,125.35 221.8,125.391 221.8,128.045 230.73,128.375 221.8,132.313 221.8,135.95 221.8,139.942 221.8,143.654 221.8,147.314 200.475,148.2 221.8,150.655 221.8,154.247 221.8,157.482 221.8,160.6
  other v4: 128.8,21.9 130.3,21.9 131.825,21.9 133.325,21.9 128.8,23.375 130.3,23.375 131.825,23.375 133.325,23.375 128.8,24.875 130.3,24.875 131.825,24.875 133.325,24.875 128.85,26.375 130.35,26.375 131.875,26.375 133.375,26.375 128.85,27.875 130.35,27.875 131.875,27.875 133.375,27.875 128.825,29.375 130.325,29.375 131.85,29.375 133.35,29.375 126.775,66.975 128.275,66.975 129.8,66.975 131.3,66.975 126.775,68.45 128.275,68.45 129.8,68.45 131.3,68.45 126.775,69.95 128.275,69.95 129.8,69.95 131.3,69.95 126.825,71.45 128.325,71.45 129.85,71.45 131.35,71.45 126.825,72.95 128.325,72.95 129.85,72.95 131.35,72.95 126.8,74.45 128.3,74.45 129.825,74.45 131.325,74.45 126.25,125.95 127.75,125.95 129.275,125.95 130.775,125.95 126.25,127.425 127.75,127.425 129.275,127.425 130.775,127.425 126.25,128.925 127.75,128.925 129.275,128.925 130.775,128.925 126.3,130.425 127.8,130.425 129.325,130.425 130.825,130.425 126.3,131.925 127.8,131.925 129.325,131.925 130.825,131.925 126.275,133.425 127.775,133.425 129.3,133.425 130.8,133.425 126.75,172.525 128.25,172.525 129.775,172.525 131.275,172.525 126.75,174 128.25,174 129.775,174 131.275,174 126.75,175.5 128.25,175.5 129.775,175.5 131.275,175.5 126.8,177 128.3,177 129.825,177 131.325,177 126.8,178.5 128.3,178.5 129.825,178.5 131.325,178.5 126.775,180 128.275,180 129.8,180 131.3,180
  other v5: 92.744,0.441 210.348,0.817 169.464,0.97 210.348,4.102 210.348,6.733 210.348,10.417 169.464,12.79 210.348,13.956 210.348,19.066 210.348,24.868 210.348,29.206 210.348,32.865 169.464,34.213 210.348,38.616 92.744,45.509 173.482,52.603 92.6,75.5 210.348,76.39 210.348,84.84 210.348,90.391 210.348,96.85 210.348,107.063 169.464,110.784 169.464,114.713 169.464,118.157 169.464,121.831 187.455,123.523 190.255,124.259 187.455,126.559 169.464,128.932 169.464,131.282 169.464,134.449 169.464,138.849 169.464,143.033 169.464,145.162 169.464,147.163 169.464,151.307 169.464,160.389 169.464,178.096 169.464,184.53 169.464,190.388 169.464,199.304
  other v6: 92.744,3.239 92.744,9.406 92.744,15.307 92.744,36.725 92.744,52.212 92.744,60.958 92.744,65.659 116.402,78.438 92.769,84.872 92.744,117.514 92.744,121.994 92.744,143.293 92.744,150.84 92.744,157.128 169.464,164.531 158.926,164.575 162.831,164.575 92.744,166.71 92.744,187.943 160.906,193.963 181.684,193.963 92.744,198.55
  other v7: 189.254,59.6 194.039,59.6 198.687,59.6 204.429,59.6 210.348,59.6 216.46,59.6 185.158,61.967 182.825,64.7 180.5,67.025 151.077,69.125 154.798,69.125 158.715,69.125 162.264,69.125 166.221,69.125 169.947,69.125 173.668,69.125 178,69.125
  other v8: 133.57,69.125 141.569,69.125
  other v9: 227.472,91.7
  other v10: 93.015,125.247 92.735,135.128
GND_2: C28.2 J5.2 R124.1 R125.1 TP55.1 U2.3 U3.9 U3.15 U18.5 ZD18.1 ZD19.1 | length 1.7
  Bottom Layer w0.5: U18.5@233.295,152.487 v3(233.295,154.175)
  other v1: 243.302,133.793 227.472,136.985 243.302,142.605 243.302,147.257 227.472,151.625 243.302,153.487 227.472,163.461 243.302,169.775
  other v3: 231.25,139.279 240.722,139.534 241.407,151.487
NetBT1_2: BT1.2 D27.1 U4.1 | length 20.9
  Bottom Layer w0.3: D27.1@186.224,139.454 186.259,139.489 186.259,140.161 186.033,140.387 186.033,141.059 186.333,141.359 188.851,141.359 189.539,140.671 189.539,133.694 190.555,132.678 190.555,132.598 190.555,131.915 U4.1@188.948,130.309 ; BT1.2@187.17,136.063 BT1.2@187.218,136.015
  Bottom Layer w0.5: D27.1@186.224,139.454 186.224,138.76 187.17,137.813 BT1.2@187.17,136.063
NetC2_1: C2.1 L1.1 RG1.3 TP56.1 | length 48.4
  Top Layer w1: C2.1@158.701,22.425 159.458,22.425 C2.1@159.883,22.85 ; C2.1@160.67,22.85 C2.1@160.7,22.85 C2.1@160.72,22.83 ; L1.1@168.433,22.83 L1.1@168.714,22.55 L1.1@168.825,22.661
  Top Layer w2: C2.1@160.72,22.83 L1.1@168.433,22.83 ; L1.1@168.825,22.661 TP56.1@168.825,30.125
  Bottom Layer w1: 169.468,29.607 169.468,29.676
  Bottom Layer w2: TP56.1@168.634,30.51 169.468,29.676 179.1,20.044 179.1,4.663 178.6,4.163 RG1.3@178.6,3.9
NetC6_1: C6.1 C8.1 C10.1 C57.1 D27.2 L4.1 TP71.1 U4.9 U4.24 U4.36 U4.48 | length 140.1
  Top Layer w0.3: v1(180.443,122.85) 183.119,122.85 185.519,125.25 201.089,125.25
  Top Layer w0.5: v1(191,136.154) 199.593,136.154 v3(200.257,135.49) 201.089,134.658 201.089,125.25 201.089,125.02 201.089,117.527 v3(195.211,111.649)
  Top Layer w1: C57.1@203.375,104.275 203.724,104.275 206.804,101.195 206.804,99.15 205.429,97.775 L4.1@204.5,97.775
  Bottom Layer w0.3: v1(180.443,122.85) 180.477,122.884 181.524,122.884 182.624,123.984 U4.36@182.938,124.299 ; U4.48@186.827,130.309 185.943,131.193 185.943,134.138 184.491,135.59 184.491,136.625 D27.2@183.342,137.774 182.438,138.679 182.438,140.091 185.6,143.254 187.936,143.254 191,140.19 v1(191,136.154) ; U4.24@188.948,120.409 188.948,120.406 189.587,119.767 189.587,117.273 v3(195.211,111.649) ; U4.9@191.777,127.48 192.093,127.797 193.832,129.536 193.851,129.536 195.59,131.275 196.261,131.275 C10.1@197.435,132.449 ; C10.1@197.476,132.408 199.3,134.232 199.3,134.533 199.249,134.482 199.239,134.482 ; C6.1@200.138,106.218 200.138,107.507 C6.1@200.174,107.542
  Bottom Layer w0.5: v3@195.212,111.649 197.489,111.649 C8.1@199.168,109.97 ; TP71.1@195.75,104.325 195.75,106.551 C8.1@199.168,109.97 ; 199.3,134.533 v3(200.257,135.49) ; C6.1@200.174,107.542 200.174,108.965 C8.1@199.168,109.97
  Bottom Layer w1: C6.1@200.138,105.93 200.209,105.86 200.209,103.347 v1(200.863,102.693)
NetC7_1: C7.1 C13.1 C33.2 J9.1 R131.1 U6.6 VD2.1 VD3.2 VT2.S VT3.D ZD3.1 | length 117.5
  Top Layer w0.5: VT2.S@64.117,142.306 64.117,140.276 66.368,138.025 89.706,138.025 v3(95.086,143.404) ; v3@95.156,143.475 97.09,145.409 106.123,145.409 106.582,144.95 v1(109.587,144.95)
  Top Layer w1.8: 31.276,145.554 31.322,145.6 VT3.D@44.405,145.6 ; VT3.D@44.497,145.6 VD3.2@49.5,145.6 56.448,138.652 58.923,138.652 VD2.1@59,138.575
  Bottom Layer w0.5: U6.6@112.204,144.95 113.986,144.95 115.023,145.987 C13.1@115.023,150.289
  Bottom Layer w0.6: v1(109.587,144.95) U6.6@112.204,144.95
  Bottom Layer w1: R131.1@93.69,146.799 93.841,146.799 94.444,146.196 96.354,146.196 ZD3.1@96.85,145.7 ; v3(95.086,143.404) 95.086,143.836 ZD3.1@96.85,145.6
  Bottom Layer w2: 30.863,145.554 VT3.D@44.451,145.554 C33.2@47.075,145.554 ; C33.2@47.075,145.78 47.301,145.554 49.4,145.554 49.408,145.562 49.446,145.562 VD3.2@49.454,145.554
NetC12_1: C12.1 C48.1 C55.2 J8.1 R127.1 U5.6 VD1.1 VD4.2 VT1.S VT4.D ZD1.1 | length 118.3
  Top Layer w0.5: v3@96.824,38.518 96.968,38.518 v3(97.025,38.575)
  Top Layer w1: VT1.S@64.834,37.506 64.834,35.766 67.575,33.025 91.331,33.025 v3@96.824,38.518 ; v3(97.025,38.575) 98.316,39.866 108.063,39.866 v1(109.333,38.596)
  Top Layer w1.8: 31.993,40.554 VT4.D@44.451,40.554 VD4.2@49.275,40.554 ; VD4.2@49.5,40.691 55.764,34.427 58.923,34.427 VD1.1@59,34.35
  Bottom Layer w0.6: v1(109.333,38.596) U5.6@111.369,38.596 ; U5.6@113.039,38.596 113.864,38.596 115.597,40.329 115.597,44.11 114.3,45.407 C12.1@114.3,48.275
  Bottom Layer w1: R127.1@93.7,41.724 93.851,41.724 94.95,40.625 ZD1.1@97.025,40.625 v3(97.025,38.575)
  Bottom Layer w2: 31.803,40.554 VT4.D@44.451,40.554 VD4.2@49.127,40.554
  Bottom Layer w5: 30.547,40.554 31.803,40.554
NetC12_2: C12.2 D1.1 TP23.1 U5.8 | length 19.5
  Top Layer w0.6: v3@114.697,41.193 114.697,41.972 116.862,44.137 116.862,44.908 v3(116.9,44.946)
  Bottom Layer w0.6: TP23.1@108.418,44.724 109.876,43.265 109.876,41.886 110.626,41.136 U5.8@111.369,41.136 ; U5.8@113.039,41.157 113.057,41.139 v3(114.697,41.139) ; v3(116.9,44.946) 120.318,44.946 119.768,45.496 119.768,45.532 C12.2@117.161,48.139
NetC13_2: C13.2 D2.1 TP24.1 U6.8 | length 19.2
  Bottom Layer w0.6: TP24.1@109.22,149.824 109.22,148.106 109.836,147.49 U6.8@112.204,147.49 112.204,152.031 113.313,153.139 C13.2@115.023,153.139 115.175,152.987 118.708,152.987 119.718,151.977 120.168,151.977 D2.1@120.718,151.427
NetC14_2: C14.2 C55.1 C60.1 C69.2 R29.2 R30.2 TP43.1 VD4.1 VD7.1 VT4.S VT10.S ZD2.1 ZD9.1 | length 68
  Top Layer w0.3: v3(99.075,21.986) 101.041,21.986 102.181,20.846 109.78,20.846 109.956,21.022 109.956,25.274 109.78,25.45 R29.2@107.8,25.45
  Top Layer w2: VT10.S@44.451,15.594 44.483,15.594 44.705,15.816 VT10.S@44.705,15.848 ; VT4.S@44.594,43.205 48.355,46.966 49.183,46.966 VD4.1@49.221,47.004 ; VD7.1@48.469,19.612 49.408,19.612 VD7.1@49.408,19.65 ; VD4.1@49.275,47.004 49.277,47.002 C14.2@53.675,47 C14.2@53.675,47 ; C69.2@53.587,19.662 C69.2@53.6,19.675
  Top Layer w2.2: VT10.S@44.705,15.848 VD7.1@48.469,19.612 ; VD7.1@49.287,19.662 C69.2@53.587,19.662
  Bottom Layer w1: ZD9.1@95.093,7.407 ZD9.1@95.743,8.057
  Bottom Layer w1.6: ZD9.1@95.743,8.156 95.743,21.986 ; ZD2.1@96.775,30.875 96.775,26.505 95.743,25.473 95.743,21.986 ; R30.2@100.217,21.986 95.743,21.986
  other v2: 52.168,23.257 53.793,23.257 55.418,23.257 56.993,23.257 52.168,24.932 53.793,24.932 55.418,24.932 56.993,24.932 52.168,26.582 53.793,26.582 55.418,26.582 56.993,26.582 52.168,28.232 53.793,28.232 55.418,28.232 56.993,28.232
NetC17_2: C17.2 J11.5 R116.1 SW1.3 SW1.4 U4.41 | length 117.3
  Top Layer w0.5: v1(179.093,130.675) 179.093,135.473 187.495,143.875 195.552,143.875 197.475,145.798 197.475,155.175 208.34,166.04 212.315,166.04 215.438,169.163 SW1.3@215.438,171.103 212.075,171.103 209.6,173.578 209.6,176.725 207.575,178.75 205.625,178.75 196.134,188.241 J11.5@196.134,193.963 ; SW1.3@214.229,171.846 214.695,171.846 SW1.3@214.972,171.569
  Bottom Layer w0.3: v1(179.093,130.675) 181.511,130.675 U4.41@184.352,127.834
  Bottom Layer w0.8: R116.1@211.731,170.129 R116.1@211.731,170.972 ; C17.2@211.75,172.224 211.731,172.205 R116.1@211.731,170.972 ; SW1.4@223.058,171.103 SW1.3@215.438,171.103 215.307,170.972 R116.1@211.731,170.972
NetC18_2: C18.2 J11.3 R117.1 SW2.3 SW2.4 U4.2 | length 78.3
  Top Layer w0.5: SW2.4@187.752,171.103 190.512,171.103 190.618,171.209 190.618,189.493 191.054,189.929 J11.3@191.054,193.963 ; v1(190.568,145.952) 190.618,146.002 190.618,171.103
  Bottom Layer w0.3: U4.2@189.302,129.955 191.979,132.633 191.73,132.882 191.73,136.386 191.48,136.636 191.48,143.363 190.568,144.275 v1(190.568,145.952)
  Bottom Layer w0.8: SW2.3@180.132,171.103 180.427,170.808 R117.1@183.942,170.808 ; C18.2@183.945,172.496 183.944,172.495 183.944,170.809 R117.1@183.942,170.808 ; SW2.4@187.752,171.103 187.457,170.808 R117.1@183.942,170.808
NetC19_2: C19.2 J11.4 R118.1 SW3.3 SW3.4 U4.3 | length 86.4
  Top Layer w0.3: v1(191.818,145.95) v1@191.846,145.978 ; v1@191.846,163.072 v1(191.875,163.1)
  Top Layer w0.5: v1@191.846,145.978 v1@191.846,163.072 ; J11.4@193.594,193.963 193.594,171.572 194.063,171.103 SW3.3@197.785,171.103 ; SW3.3@197.844,171.044 SW3.3@197.785,171.103 ; SW3.4@205.405,171.103 SW3.3@197.785,171.103
  Bottom Layer w0.3: U4.3@189.656,129.602 192.587,132.533 192.587,132.704 192.333,132.958 192.333,136.462 192.079,136.716 192.079,143.614 191.818,143.875 v1(191.818,145.95)
  Bottom Layer w0.5: v1(191.875,163.1) 197.785,169.01 SW3.3@197.785,171.103 SW3.3@197.468,170.786 ; R118.1@193.864,170.351 193.869,170.355 R118.1@193.869,170.786 ; C19.2@193.869,172.726 C19.2@193.873,172.73
  Bottom Layer w1: C19.2@193.869,172.726 193.869,170.786 SW3.3@197.468,170.786
NetC20_1: C20.1 R30.1 R35.2 R69.2 TP45.1 | length 11.2
  Bottom Layer w0.5: TP45.1@100.596,19.4 101.841,20.645 101.841,21.582 R30.1@101.955,21.582 ; R30.1@101.969,21.596 103.364,21.596 103.692,21.924 103.692,24.193 103.66,24.225 C20.1@103.66,24.375 103.66,24.525 103.718,24.583 R69.2@103.718,26.774 ; R30.1@101.969,21.986 R35.2@103.578,21.986
NetC21_1: C21.1 R33.1 R36.2 R71.2 TP46.1 | length 10